# Altium PCB EEM_FMC_Carrier.PcbDoc (part 2 of 19)
Units mm, origin at the board's own origin, x right, y up, seen from the top; angles counter-clockwise.
Board outline 222.9 x 100 mm, 6 copper layers (TopLayer, MidLayer1, MidLayer2, SignalLayer1, Internal Plane 1, BottomLayer), stack 1.528 mm thick; 790 components, 743 nets, 3570 pads, 2277 vias.
Unrouted connection lines stored in the file: 3.
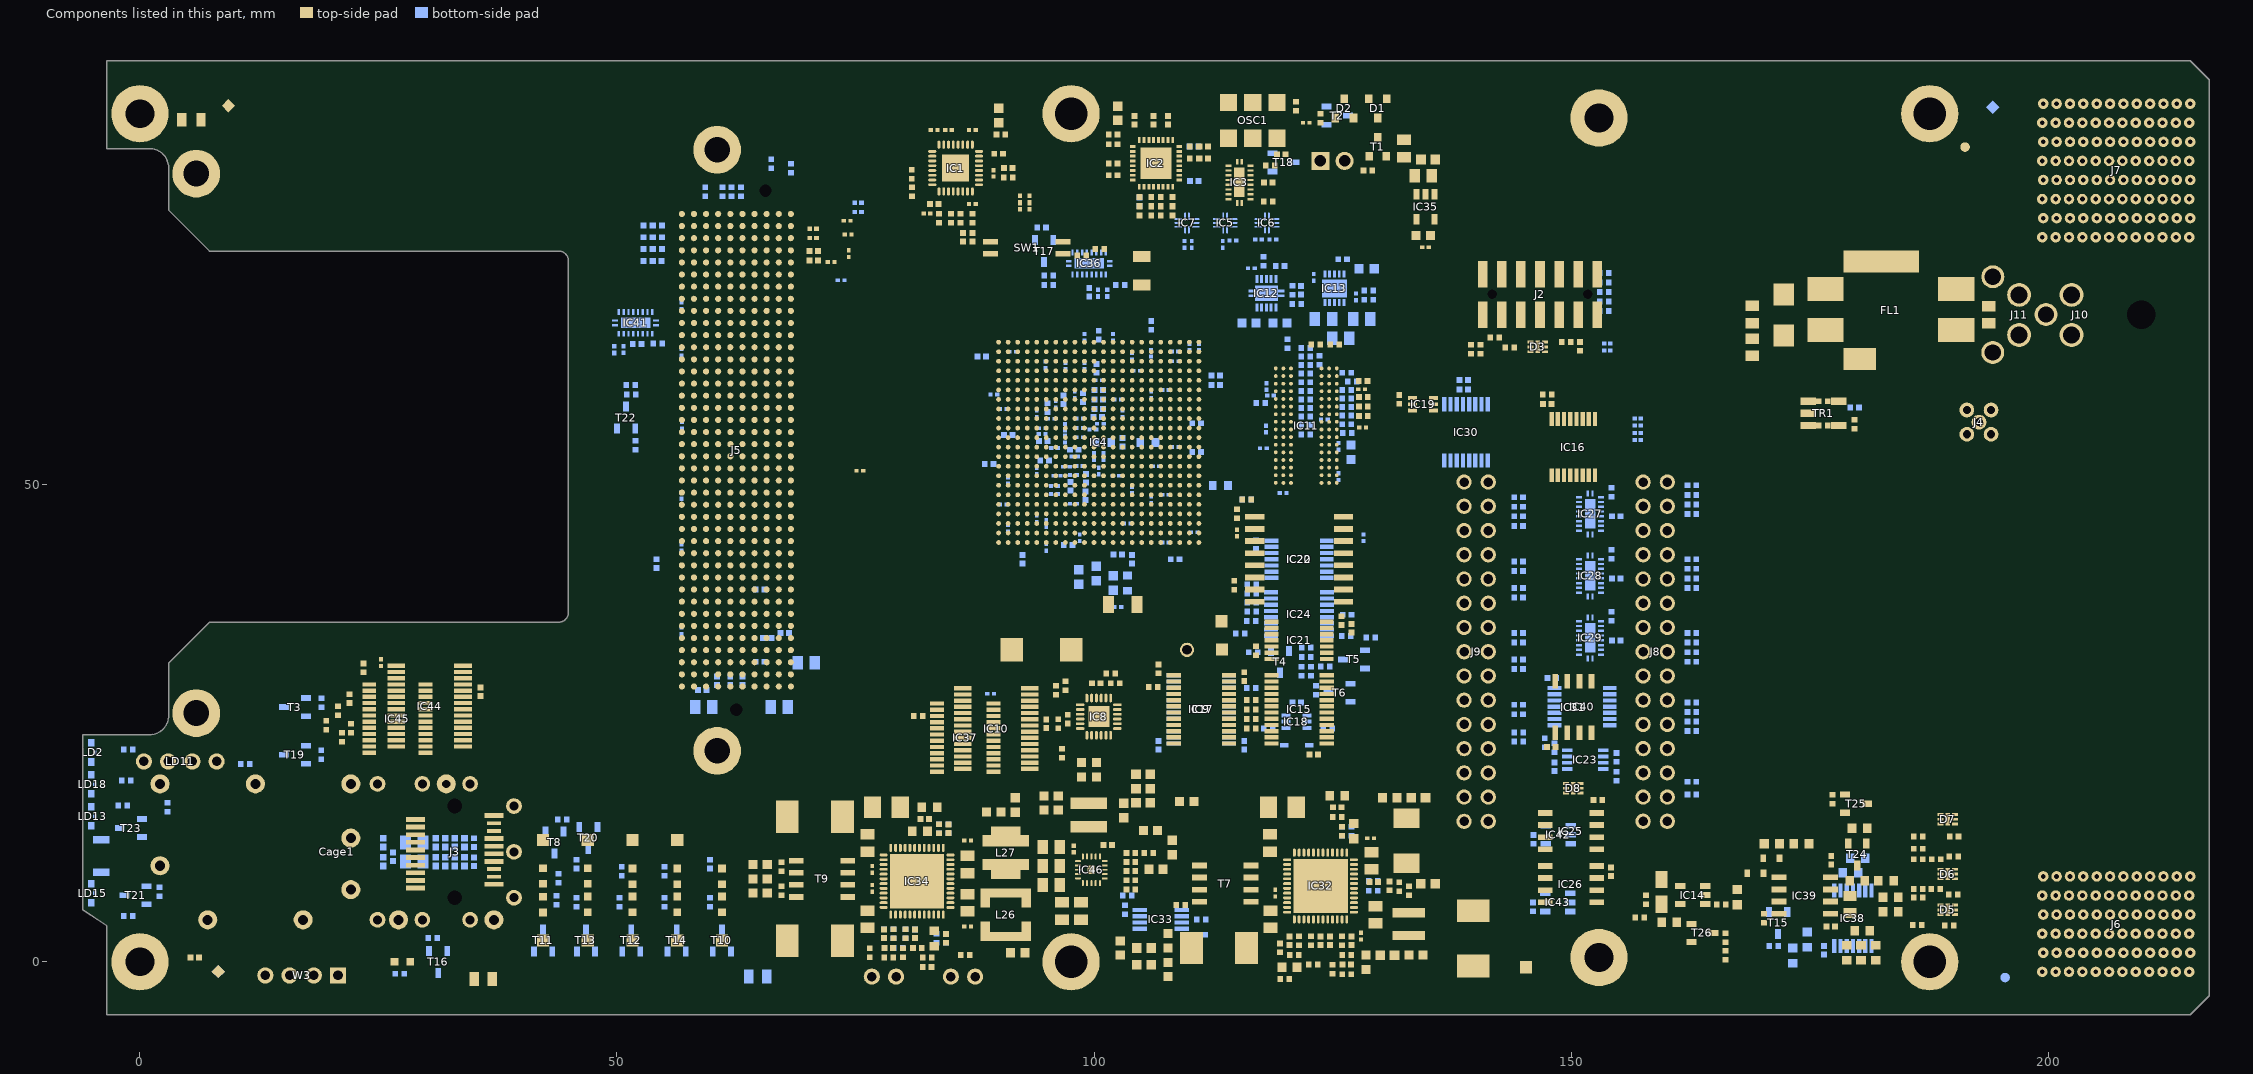
[diagram p6: the components of this part, seen from the top]

## Classes and differential pairs (continued)
differential pair FMC.LA5: +FMC.LA_P5 -FMC.LA_N5
differential pair FMC.LA4: +FMC.LA_P4 -FMC.LA_N4
differential pair FMC.LA3: +FMC.LA_P3 -FMC.LA_N3
differential pair FMC.LA2: +FMC.LA_P2 -FMC.LA_N2
differential pair FMC.LA1: +FMC.LA_P1 -FMC.LA_N1
differential pair FMC.LA0: +FMC.LA_P0 -FMC.LA_N0
differential pair FMC.HB21: +FMC.HB_P21 -FMC.HB_N21
differential pair FMC.HB20: +FMC.HB_P20 -FMC.HB_N20
differential pair FMC.HB19: +FMC.HB_P19 -FMC.HB_N19
differential pair FMC.HB18: +FMC.HB_P18 -FMC.HB_N18
differential pair FMC.HB17: +FMC.HB_P17 -FMC.HB_N17
differential pair FMC.HB16: +FMC.HB_P16 -FMC.HB_N16
differential pair FMC.HB15: +FMC.HB_P15 -FMC.HB_N15
differential pair FMC.HB14: +FMC.HB_P14 -FMC.HB_N14
differential pair FMC.HB13: +FMC.HB_P13 -FMC.HB_N13
differential pair FMC.HB12: +FMC.HB_P12 -FMC.HB_N12
differential pair FMC.HB11: +FMC.HB_P11 -FMC.HB_N11
differential pair FMC.HB10: +FMC.HB_P10 -FMC.HB_N10
differential pair FMC.HB9: +FMC.HB_P9 -FMC.HB_N9
differential pair FMC.HB8: +FMC.HB_P8 -FMC.HB_N8
differential pair FMC.HB7: +FMC.HB_P7 -FMC.HB_N7
differential pair FMC.HB6: +FMC.HB_P6 -FMC.HB_N6
differential pair FMC.HB5: +FMC.HB_P5 -FMC.HB_N5
differential pair FMC.HB4: +FMC.HB_P4 -FMC.HB_N4
differential pair FMC.HB3: +FMC.HB_P3 -FMC.HB_N3
differential pair FMC.HB2: +FMC.HB_P2 -FMC.HB_N2
differential pair FMC.HB1: +FMC.HB_P1 -FMC.HB_N1
differential pair FMC.HB0: +FMC.HB_P0 -FMC.HB_N0
differential pair FMC.HA23: +FMC.HA_P23 -FMC.HA_N23
differential pair FMC.HA22: +FMC.HA_P22 -FMC.HA_N22
differential pair FMC.HA21: +FMC.HA_P21 -FMC.HA_N21
differential pair FMC.HA20: +FMC.HA_P20 -FMC.HA_N20
differential pair FMC.HA19: +FMC.HA_P19 -FMC.HA_N19
differential pair FMC.HA18: +FMC.HA_P18 -FMC.HA_N18
differential pair FMC.HA17: +FMC.HA_P17 -FMC.HA_N17
differential pair FMC.HA16: +FMC.HA_P16 -FMC.HA_N16
differential pair FMC.HA15: +FMC.HA_P15 -FMC.HA_N15
differential pair FMC.HA14: +FMC.HA_P14 -FMC.HA_N14
differential pair FMC.HA13: +FMC.HA_P13 -FMC.HA_N13
differential pair FMC.HA12: +FMC.HA_P12 -FMC.HA_N12
differential pair FMC.HA11: +FMC.HA_P11 -FMC.HA_N11
differential pair FMC.HA10: +FMC.HA_P10 -FMC.HA_N10
differential pair FMC.HA9: +FMC.HA_P9 -FMC.HA_N9
differential pair FMC.HA8: +FMC.HA_P8 -FMC.HA_N8
differential pair FMC.HA7: +FMC.HA_P7 -FMC.HA_N7
differential pair FMC.HA6: +FMC.HA_P6 -FMC.HA_N6
differential pair FMC.HA5: +FMC.HA_P5 -FMC.HA_N5
differential pair FMC.HA4: +FMC.HA_P4 -FMC.HA_N4
differential pair FMC.HA3: +FMC.HA_P3 -FMC.HA_N3
differential pair FMC.HA2: +FMC.HA_P2 -FMC.HA_N2
differential pair FMC.HA1: +FMC.HA_P1 -FMC.HA_N1
differential pair FMC.HA0: +FMC.HA_P0 -FMC.HA_N0
differential pair EEM_IO.LVDS15: +EEM_IO.LVDS_P15 -EEM_IO.LVDS_N15
differential pair EEM_IO.LVDS14: +EEM_IO.LVDS_P14 -EEM_IO.LVDS_N14
differential pair EEM_IO.LVDS13: +EEM_IO.LVDS_P13 -EEM_IO.LVDS_N13
differential pair EEM_IO.LVDS12: +EEM_IO.LVDS_P12 -EEM_IO.LVDS_N12
differential pair EEM_IO.LVDS11: +EEM_IO.LVDS_P11 -EEM_IO.LVDS_N11
differential pair EEM_IO.LVDS10: +EEM_IO.LVDS_P10 -EEM_IO.LVDS_N10
differential pair EEM_IO.LVDS9: +EEM_IO.LVDS_P9 -EEM_IO.LVDS_N9
differential pair EEM_IO.LVDS8: +EEM_IO.LVDS_P8 -EEM_IO.LVDS_N8
differential pair EEM_IO.LVDS7: +EEM_IO.LVDS_P7 -EEM_IO.LVDS_N7
differential pair EEM_IO.LVDS6: +EEM_IO.LVDS_P6 -EEM_IO.LVDS_N6
differential pair EEM_IO.LVDS5: +EEM_IO.LVDS_P5 -EEM_IO.LVDS_N5
differential pair EEM_IO.LVDS4: +EEM_IO.LVDS_P4 -EEM_IO.LVDS_N4
differential pair EEM_IO.LVDS3: +EEM_IO.LVDS_P3 -EEM_IO.LVDS_N3
differential pair EEM_IO.LVDS2: +EEM_IO.LVDS_P2 -EEM_IO.LVDS_N2
differential pair EEM_IO.LVDS1: +EEM_IO.LVDS_P1 -EEM_IO.LVDS_N1
differential pair EEM_IO.LVDS0: +EEM_IO.LVDS_P0 -EEM_IO.LVDS_N0
differential pair BP_MGT.Tx: +BP_MGT.Tx_P -BP_MGT.Tx_N
differential pair BP_IO.LVDS15: +BP_IO.LVDS_P15 -BP_IO.LVDS_N15
differential pair BP_IO.LVDS14: +BP_IO.LVDS_P14 -BP_IO.LVDS_N14
differential pair BP_IO.LVDS13: +BP_IO.LVDS_P13 -BP_IO.LVDS_N13
differential pair BP_IO.LVDS12: +BP_IO.LVDS_P12 -BP_IO.LVDS_N12
differential pair BP_IO.LVDS11: +BP_IO.LVDS_P11 -BP_IO.LVDS_N11
differential pair BP_IO.LVDS10: +BP_IO.LVDS_P10 -BP_IO.LVDS_N10
differential pair BP_IO.LVDS9: +BP_IO.LVDS_P9 -BP_IO.LVDS_N9
differential pair BP_IO.LVDS8: +BP_IO.LVDS_P8 -BP_IO.LVDS_N8
differential pair BP_IO.LVDS7: +BP_IO.LVDS_P7 -BP_IO.LVDS_N7
differential pair BP_IO.LVDS6: +BP_IO.LVDS_P6 -BP_IO.LVDS_N6
differential pair BP_IO.LVDS5: +BP_IO.LVDS_P5 -BP_IO.LVDS_N5
differential pair BP_IO.LVDS4: +BP_IO.LVDS_P4 -BP_IO.LVDS_N4
differential pair BP_IO.LVDS3: +BP_IO.LVDS_P3 -BP_IO.LVDS_N3
differential pair BP_IO.LVDS2: +BP_IO.LVDS_P2 -BP_IO.LVDS_N2
differential pair BP_IO.LVDS1: +BP_IO.LVDS_P1 -BP_IO.LVDS_N1
differential pair BP_IO.LVDS0: +BP_IO.LVDS_P0 -BP_IO.LVDS_N0
differential pair CK_MMCX_IN: +CK_MMCX_IN_P -CK_MMCX_IN_N
differential pair CK_MMCX: +CK_MMCX_P -CK_MMCX_N
differential pair DDR3_CK: +DDR3_CK_P -DDR3_CK_N
differential pair DDR3_LDQS: +DDR3_LDQS_P -DDR3_LDQS_N
differential pair DDR3_UDQS: +DDR3_UDQS_P -DDR3_UDQS_N
differential pair MGT_RX3: +MGT_RX3_P -MGT_RX3_N
differential pair MGT_TX3: +MGT_TX3_P -MGT_TX3_N
differential pair GBTCLK0_M2C: +GBTCLK0_M2C_P -GBTCLK0_M2C_N

## Components (designator, comment, footprint, x,y, rotation, side; value= is the part's Value field where it differs from the comment)
B1 "Plated Hole" c150h100 109.748,32.7 r0 top
B2 "Test Point" TPS127#1 113.375,35.7 r90 top
B3 "Test Point" TPS127#1 113.4,32.725 r90 top
B6 "Plated Hole" MTG270_500 5.9,26.069 r0 top
B7 "Plated Hole" MTG270_500 5.9,82.619 r0 top
B8 "Plated Hole" MTG270_500 60.5,85.119 r0 top
B9 "Plated Hole" MTG270_500 60.5,22.119 r0 top locked
C1 "100nF" CAPC1005X55N 104.748,78.7 r270 top
C2 "100nF" CAPC1005X55N 105.998,78.7 r270 top
C3 "100nF" CAPC1005X55N 179.724,58.117 r180 bottom
C4 "100nF" CAPC1005X55N 87.248,75.95 r270 top
C5 "100nF" CAPC1005X55N 104.748,79.7 r90 top
C6 "100nF" CAPC1005X55N 86.248,75.95 r270 top
C7 "100nF" CAPC1005X55N 105.998,79.7 r90 top
C8 "10nF" CAPC1005X55N 90.998,83.2 r180 top
C9 "100nF" CAPC1005X55N 106.998,78.7 r270 top
C10 "100nF" CAPC1005X55N 110.523,81.825 r180 bottom
C11 "100nF" CAPC1005X55N 108.248,78.7 r270 top
C12 "100nF" CAPC1005X55N 106.998,79.7 r90 top
C13 "100nF" CAPC1005X55N 108.248,79.7 r90 top
C14 "10uF" CAPC1005X70N 33,10.5 r90 bottom
C15 "10nF" CAPC1005X55N 89.998,84.7 r180 top
C16 "100nF" CAPC1005X55N 110.473,85.475 r180 bottom
C17 "10uF" CAPC1005X70N 32,10.5 r90 bottom
C18 "10uF" CAPC1005X70N 34,10.5 r90 bottom
C19 "10uF" CAPC1005X70N 31,10.5 r90 bottom
C20 "100nF" CAPC1005X55N 35,10.5 r270 bottom
C21 "100nF" CAPC1005X55N 104.748,79.675 r90 bottom
C22 "10nF" CAPC1005X55N 107.748,88.2 r270 top
C23 "10nF" CAPC1005X55N 101.998,85.7 r0 top
C24 "10nF" CAPC1005X55N 101.998,82.45 r0 top
C25 "100nF" CAPC1005X55N 101.998,86.7 r0 top
C26 "10nF" CAPC1005X55N 104.248,88.2 r270 top
C27 "10nF" CAPC1005X55N 106.248,88.2 r270 top
C28 "10nF" CAPC1005X55N 101.998,83.7 r0 top
C29 "100nF" CAPC1005X55N 111.498,84.2 r0 top
C30 "100nF" CAPC1005X55N 111.498,85.45 r0 top
C31 "10nF" CAPC1005X55N 119.623,84.65 r180 top
C32 "1uF" CAPC1005X55N 90.248,86.7 r180 top
C33 "100nF" CAPC0603X33N#1 83.248,87.2 r0 top
C34 "100nF" CAPC0603X33N#1 87.248,79.45 r180 top
C35 "100nF" CAPC0603X33N#1 82.498,78.45 r0 top
C36 "100nF" CAPC0603X33N#1 84.748,87.2 r180 top
C37 "470nF" CAPC0603X33N#1 87.248,87.2 r180 top
C38 "22pF" CAPC1005X55N 83.248,79.45 r0 top
C39 "100nF" CAPC1005X55N 118.248,81.7 r180 top
C40 "1uF" CAPC1608X87N 167.431,6.782 r270 top
C41 "100nF" CAPC0603X33N#1 109.998,64.45 r270 bottom
C42 "10uF" CAPC1005X70N 25.5,12.5 r270 bottom
C43 "2.2uF" CAPMP3216X180N 159.502,7.33 r90 top
C44 "10uF" CAPC2012X95N 128.075,67.394 r180 bottom
C45 "100nF" CAPC0603X33N#1 103.974,63.461 r270 bottom
C46 "100nF" CAPC0603X33N#1 114.548,75.6 r180 bottom
C47 "100nF" CAPC0603X33N#1 118.748,75.7 r180 bottom
C48 "100nF" CAPC0603X33N#1 110.248,75.2 r90 bottom
C49 "100nF" CAPC0603X33N#1 113.498,75.2 r90 bottom
C50 "100nF" CAPC0603X33N#1 117.248,75.7 r0 bottom
C51 "100nF" CAPC0603X33N#1 109.498,75.2 r90 bottom
C52 "100nF" CAPC0603X33N#2 75.275,78.6 r0 bottom
C53 "100nF" CAPC0603X33N#2 75.275,79.575 r0 bottom
C54 "100nF" CAPC0603X33N#2 70.55,76.825 r0 top
C55 "100nF" CAPC0603X33N#2 70.55,75.875 r0 top
C56 "100nF" CAPC0603X33N#2 50.675,64.182 r270 bottom
C57 "100nF" CAPC0603X33N#2 49.725,64.175 r270 bottom
C58 "100nF" CAPC0603X33N#2 101.375,70.1 r270 bottom
C59 "100nF" CAPC0603X33N#2 100.425,70.1 r270 bottom
C60 "100nF" CAPC0603X33N#2 97.875,11.825 r270 top
C61 "10uF" CAPC2012X95N 95.525,12.05 r0 top
C62 "10uF" CAPC2012X95N 98.65,5.325 r90 top
C63 "10uF" CAPC2012X95N 96.65,5.325 r90 top
C64 "100nF" CAPC0603X33N#1 90.498,47.95 r0 bottom
C65 "100nF" CAPC0603X33N#1 94.998,45.95 r90 bottom
C66 "100nF" CAPC1005X55N 115.748,22.7 r90 bottom
C67 "100nF" CAPC1005X55N 106.748,22.7 r90 bottom
C68 "10uF" CAPC2012X95N 95.525,10.05 r0 top
C69 "10uF" CAPC2012X95N 95.525,8.05 r0 top
C70 "22uF" CAPC1608X90N 95.5,15.9 r0 top
C71 "22uF" CAPC1608X90N 95.5,17.4 r0 top
C72 "10uF" CAPC2012X95N 132.5,85.25 r270 top
C73 "100nF" CAPC0603X33N#1 122.248,87.95 r180 top
C74 "100nF" CAPC1005X55N 100.248,29.2 r0 top
C75 "100nF" CAPC1005X55N 115.75,29.9 r270 top
C76 "100nF" CAPC1005X55N 106.748,30.7 r270 top
C77 "100nF" CAPC1005X55N 94.998,24.95 r90 top
C78 "100nF" CAPC0603X33N#3 118.498,59.375 r0 bottom
C79 "100nF" CAPC0603X33N#1 128.15,55.994 r180 top
C80 "100nF" CAPC0603X33N#1 118.073,60.3 r270 bottom
C81 "100nF" CAPC0603X33N#1 118.023,55.85 r90 bottom
C82 "100nF" CAPC0603X33N#1 119.823,49.125 r0 bottom
C83 "100nF" CAPC0603X33N#1 125.623,50.85 r270 bottom
C84 "100nF" CAPC0603X33N#1 128.048,60.025 r180 top
C85 "100nF" CAPC0603X33N#1 125.623,54.025 r90 bottom
C86 "100nF" CAPC0603X33N#1 117.748,53.825 r0 bottom
C87 "100nF" CAPC0603X33N#1 124.148,56.85 r180 bottom
C88 "1uF" CAPC1005X55N 119.498,72.95 r180 bottom
C89 "22uF" CAPC1608X90N 126.923,53.425 r90 bottom
C90 "22uF" CAPC1608X90N 116.248,66.95 r0 bottom
C91 "22uF" CAPC1608X90N 119.498,66.95 r180 bottom
C92 "10nF" CAPC1005X55N 121.695,70.398 r270 bottom
C93 "100nF" CAPC0603X33N#1 116.498,72.7 r0 bottom
C94 "1uF" CAPC1608X87N 128.575,72.644 r180 bottom
C95 "100nF" CAPC0603X33N#1 127.45,69.694 r270 bottom
C96 "10uF" CAPC2012X95N 125.875,65.369 r180 bottom
C97 "470nF" CAPC0603X33N#1 98.501,54.991 r0 bottom
C98 "100nF" CAPC0603X33N#1 98.498,55.95 r0 bottom
C99 "4.7uF" CAPC1005X55N 100.248,62.2 r270 bottom
C100 "100uF" CAPC3216X180N 104.998,72.45 r270 top
C101 "47uF" CAPC1608X100N 105.648,54.45 r0 bottom
C102 "470nF" CAPC0603X33N#1 100.498,60.95 r0 bottom
C103 "680uF" CAPMP7343X430N 94.498,32.725 r180 top
C104 "4.7uF" CAPC1005X55N 100.498,58.95 r180 bottom
C105 "4.7uF" CAPC1005X55N 99.125,48.85 r90 bottom
C106 "4.7uF" CAPC1005X55N 100.498,57.95 r180 bottom
C107 "4.7uF" CAPC1005X55N 97.942,53.67 r180 bottom
C108 "4.7uF" CAPC1005X55N 94.666,54.585 r0 bottom
C109 "4.7uF" CAPC1005X55N 99.15,50.7 r90 bottom
C110 "100uF" CAPC3216X180N 102.998,37.45 r180 top
C111 "100nF" CAPC0603X33N#1 89.175,28.1 r180 bottom
C112 "470nF" CAPC0603X33N#1 98.498,56.95 r0 bottom
C113 "470nF" CAPC0603X33N#1 99.998,52.95 r270 bottom
C114 "100nF" CAPC0603X33N#1 25.275,31.35 r270 top
C115 "4.7uF" CAPC1005X55N 112.748,61.45 r180 bottom
C116 "4.7uF" CAPC1005X55N 92.498,42.2 r90 bottom
C117 "470nF" CAPC0603X33N#1 107.498,43.95 r180 bottom
C118 "470nF" CAPC0603X33N#1 98.498,44.45 r90 bottom
C119 "470nF" CAPC0603X33N#1 105.998,48.45 r270 bottom
C120 "4.7uF" CAPC1005X55N 103.998,42.2 r90 bottom
C121 "4.7uF" CAPC1005X55N 90.998,55.2 r0 bottom
C122 "470nF" CAPC0603X33N#1 90.498,57.95 r0 bottom
C123 "470nF" CAPC0603X33N#1 94.998,43.45 r90 bottom
C124 "470nF" CAPC0603X33N#1 110.998,64.45 r270 bottom
C125 "4.7uF" CAPC1005X55N 105.998,66.7 r270 bottom
C126 "4.7uF" CAPC1005X55N 112.748,60.45 r180 bottom
C127 "470nF" CAPC0603X33N#1 89.498,59.45 r0 bottom
C128 "470nF" CAPC0603X33N#1 104.498,61.95 r180 bottom
C129 "470nF" CAPC0603X33N#1 101.998,65.45 r270 bottom
C130 "4.7uF" CAPC1005X55N 88.248,63.45 r0 bottom
C131 "4.7uF" CAPC1005X55N 88.998,52.2 r0 bottom
C132 "470nF" CAPC0603X33N#1 93.998,51.45 r270 bottom
C133 "470nF" CAPC0603X33N#1 90.998,50.45 r270 bottom
C134 "470nF" CAPC0603X33N#1 103.498,45.95 r180 bottom
C135 "4.7uF" CAPC1005X55N 110.748,56.45 r180 bottom
C136 "4.7uF" CAPC1005X55N 110.748,53.45 r180 bottom
C137 "470nF" CAPC0603X33N#1 107.498,59.95 r0 bottom
C138 "470nF" CAPC0603X33N#1 102.998,57.45 r270 bottom
C139 "470nF" CAPC0603X33N#1 105.998,59.45 r270 bottom
C140 "470nF" CAPC0603X33N#1 108.498,53.95 r0 bottom
C141 "470nF" CAPC0603X33N#1 90.998,45.45 r90 bottom
C142 "470nF" CAPC0603X33N#1 108.498,62.95 r180 bottom
C143 "470nF" CAPC0603X33N#1 93.998,57.45 r90 bottom
C144 "470nF" CAPC0603X33N#1 93.998,46.45 r90 bottom
C145 "470nF" CAPC0603X33N#1 94.564,55.321 r0 bottom
C146 "470nF" CAPC0603X33N#1 97.975,59.425 r270 bottom
C147 "470nF" CAPC0603X33N#1 97.841,48.006 r0 bottom
C148 "470nF" CAPC0603X33N#1 97.841,51.029 r0 bottom
C149 "470nF" CAPC0603X33N#1 96.952,56.032 r90 bottom
C150 "470nF" CAPC0603X33N#1 95.86,53.873 r0 bottom
C151 "470nF" CAPC0603X33N#1 96.139,50.952 r180 bottom
C152 "470nF" CAPC0603X33N#1 95.998,58.45 r270 bottom
C153 "47uF" CAPC1608X100N 100.998,54.45 r0 bottom
C154 "22uF" CAPC2012X135N 179.241,5.998 r90 top
C155 "100nF" CAPC1005X55N 177.281,10.636 r270 top
C156 "4.7uF" CAPC1005X55N 100.498,65.7 r270 bottom
C157 "470nF" CAPC0603X33N#1 100.498,51.448 r270 bottom
C158 "470nF" CAPC0603X33N#1 100.998,52.95 r90 bottom
C159 "470nF" CAPC0603X33N#1 102.498,58.95 r180 bottom
C160 "470nF" CAPC0603X33N#1 102.298,50.95 r180 bottom
C161 "470nF" CAPC0603X33N#1 100.674,56.406 r0 bottom
C162 "4.7uF" CAPC1005X55N 102.498,42.7 r180 bottom
C163 "4.7uF" CAPC1005X55N 100.498,59.95 r0 bottom
C164 "47uF" CAPC1608X100N 103.498,39.7 r90 bottom
C165 "100nF" CAPC1005X55N 177.233,3.713 r0 top
C166 "1uF" CAPC1608X87N 171.057,12.361 r0 top
C167 "100nF" CAPC1005X55N 176.5,1.225 r90 bottom
C168 "100nF" CAPC0603X33N#1 91.498,63.95 r0 bottom
C169 "100nF" CAPC0603X33N#1 98.998,65.45 r270 bottom
C170 "100nF" CAPC0603X33N#1 98.998,62.45 r270 bottom
C171 "100nF" CAPC0603X33N#1 74.298,74.225 r90 top
C172 "100nF" CAPC0603X33N#1 94.925,62.575 r270 bottom
C173 "100nF" CAPC0603X33N#1 102.498,37.2 r180 bottom
C174 "4.7uF" CAPC1005X55N 100.4,57.125 r0 bottom
C175 "47uF" CAPC1608X100N 113.248,49.95 r180 bottom
C176 "100nF" CAPC0603X33N#1 74.223,76.25 r180 top
C177 "4.7uF" CAPC1005X55N 108.498,42.2 r0 bottom
C178 "4.7uF" CAPC1005X55N 102.998,54.45 r270 bottom
C179 "100nF" CAPC1005X55N 123.048,21.725 r180 top
C180 "100nF" CAPC1005X55N 147.498,58.45 r0 top
C181 "100nF" CAPC1005X55N 121.248,27.2 r180 bottom
C182 "470nF" CAPC0603X33N#1 110.498,45.025 r180 bottom
C183 "470nF" CAPC0603X33N#1 106.498,51.95 r0 bottom
C184 "100nF" CAPC1005X55N 131.998,58.95 r270 top
C185 "100nF" CAPC1005X55N 126.998,34.95 r90 top
C186 "100nF" CAPC1005X55N 154.773,21.425 r270 bottom
C187 "100nF" CAPC1005X55N 148.248,20.45 r90 bottom
C188 "100nF" CAPC0603X33N#1 114.998,44.95 r90 top
C189 "100nF" CAPC0603X33N#1 128.248,44.45 r270 bottom
C190 "100nF" CAPC1005X55N 126.525,36.375 r180 bottom
C191 "100nF" CAPC1005X55N 116.998,43.7 r90 bottom
C192 "10uF" CAPC1005X70N 25.5,10.5 r90 bottom
C193 "100nF" CAPC0603X33N#1 75.448,51.475 r180 top
C194 "100nF" CAPC0603X33N#1 73.498,71.45 r180 bottom
C195 "100nF" CAPC1005X55N 61.873,29.45 r270 bottom
C196 "100nF" CAPC1005X55N 63.173,29.45 r90 bottom
C197 "10uF" CAPC2012X95N 59.098,26.725 r180 bottom
C198 "1uF" CAPC1005X55N 58.923,28.5 r180 bottom
C199 "10nF" CAPC1005X55N 70.623,74.5 r0 top
C200 "10nF" CAPC1005X55N 70.623,73.5 r0 top
C201 "10uF" CAPC2012X95N 134.5,82.402 r0 top
C202 "100nF" CAPC0603X33N#1 134.75,74.902 r0 top
C203 "100nF" CAPC1005X55N 64.998,39.025 r180 bottom
C204 "10uF" CAPC2012X95N 69.823,31.35 r0 bottom
C205 "1uF" CAPC1005X55N 67.598,34.475 r0 bottom
C206 "100nF" CAPC1005X55N 60.498,29.45 r90 bottom
C207 "100nF" CAPC1005X55N 64.998,31.45 r180 bottom
C208 "10uF" CAPC2012X95N 66.998,26.7 r0 bottom
C209 "1uF" CAPC1005X55N 65.748,33.95 r0 bottom
C210 "10nF" CAPC1005X55N 54.248,74.7 r0 bottom
C211 "10nF" CAPC1005X55N 54.223,73.45 r0 bottom
C212 "22pF" CAPC1005X55N 5.748,0.45 r0 top
C213 "10nF" CAPC1005X55N 53.248,74.7 r180 bottom
C214 "10nF" CAPC1005X55N 53.248,73.45 r180 bottom
C215 "10nF" CAPC1005X55N 53.248,77.2 r180 bottom
C216 "10nF" CAPC1005X55N 53.248,75.95 r180 bottom
C217 "10nF" CAPC1005X55N 54.248,77.2 r0 bottom
C218 "10nF" CAPC1005X55N 54.248,75.95 r0 bottom
C219 "100nF" CAPC1005X55N 152.825,16.944 r0 top
C220 "100nF" CAPC1005X55N 154.2,9.45 r90 top
C221 "1nF" CAPC1005X55N 138.748,60 r0 bottom
C222 "100nF" CAPC1005X55N 138.748,61 r0 bottom
C223 "100nF" CAPC1005X55N 154.748,40.2 r180 bottom
C224 "100nF" CAPC1005X55N 154.748,46.7 r180 bottom
C225 "100nF" CAPC1005X55N 154.748,33.7 r180 bottom
C226 "100nF" CAPC1005X55N 147.925,22.5 r0 top
C227 "56pF" CAPC1608X87N 120.498,-0.55 r180 top
C228 "22uF" CAPC1608X90N 107.748,-0.8 r90 top
C229 "22uF" CAPC1608X90N 107.748,2.2 r270 top
C230 "22uF" CAPC1608X90N 102.748,1.45 r270 top
C231 "33uF" CAPMP3528X210N 119.748,16.2 r0 top
C232 "10uF" CAPC2012X95N 118.498,4.45 r90 top
C233 "10uF" CAPC2012X95N 118.439,12.446 r270 top
C234 "10uF" CAPC2012X95N 129.073,10.6 r270 top
C235 "10uF" CAPC2012X95N 129.498,4.95 r90 top
C236 "22uF" CAPC1608X90N 109.725,16.8 r180 top
C237 "100nF" CAPC0603X33N#1 118.998,7.2 r90 top
C238 "1nF" CAPC1005X55N 120.498,2.2 r270 top
C239 "22uF" CAPC1608X90N 100.25,20.125 r270 top
C240 "22uF" CAPC1608X90N 98.7,20.125 r270 top
C241 "1uF" CAPC1005X55N 101.45,12.225 r180 top
C242 "22uF" CAPC1608X90N 105.925,13.75 r180 top
C243 "22uF" CAPC1608X90N 106.498,9.7 r0 top
C245 "100nF" CAPC1005X55N 111.183,2.835 r180 bottom
C248 "100nF" CAPC0603X33N#1 127.998,2.7 r90 top
C249 "1nF" CAPC1005X55N 126.998,2.2 r270 top
C250 "22uF" CAPC1608X90N 133.748,0.7 r180 top
C251 "22uF" CAPC1608X90N 128.498,-0.05 r90 top
C252 "68pF" CAPC1005X55N 126.498,-0.3 r0 top
C253 "100nF" CAPC0603X33N#1 128.998,12.95 r180 top
C254 "1.2nF" CAPC1608X87N 127.248,13.7 r90 top
C255 "22uF" CAPC1608X90N 130.998,17.2 r0 top
C256 "68pF" CAPC1005X55N 125.498,16.2 r0 top
C257 "1uF" CAPC1005X55N 129.323,8.35 r180 top
C258 "1uF" CAPC1005X55N 124.748,2.2 r90 top
C259 "1uF" CAPC1005X55N 123.748,2.2 r90 top
C260 "1uF" CAPC1005X55N 130.973,7.95 r270 top
C261 "82pF" CAPC1005X55N 78.498,1.45 r180 top
C262 "10uF" CAPC2012X95N 169,67.85 r270 top
C263 "10uF" CAPC2012X95N 169,64.425 r90 top
C264 "10uF" CAPC2012X95N 193.783,67.809 r270 top
C265 "33uF" CAPMP3528X210N 78.248,16.2 r0 top
C266 "10uF" CAPC2012X95N 76.248,12.45 r270 top
C267 "10uF" CAPC2012X95N 76.248,4.45 r90 top
C268 "10uF" CAPC2012X95N 86.748,10.2 r270 top
C269 "10uF" CAPC2012X95N 86.748,6.2 r90 top
C270 "100nF" CAPC0603X33N#1 76.748,7.7 r90 top
C271 "2.2nF" CAPC1005X55N 77.998,2.95 r270 top
C272 "22uF" CAPC1608X90N 64.998,10.2 r180 top
C273 "22uF" CAPC1608X90N 64.998,7.2 r180 top
C274 "22uF" CAPC1608X90N 64.998,8.7 r180 top
C275 "100nF" CAPC0603X33N#1 76.748,9.7 r270 top
C276 "100nF" CAPC0603X33N#1 86.748,3.7 r180 top
C277 "3.9nF" CAPC1005X55N 84.498,2.45 r270 top
C278 "22uF" CAPC1608X90N 91.998,0.95 r180 top
C279 "82pF" CAPC1005X55N 82.498,-0.55 r0 top
C280 "100nF" CAPC0603X33N#1 86.748,12.7 r180 top
C281 "2.2nF" CAPC1005X55N 84.748,13.95 r90 top
C282 "22uF" CAPC1608X90N 89.498,15.7 r0 top
C283 "100pF" CAPC1005X55N 82.248,14.95 r0 top
C284 "1uF" CAPC1005X55N 81.248,2.95 r90 bottom
C285 "1uF" CAPC1005X55N 81.248,2.95 r90 top
C286 "22uF" CAPC1608X90N 134.5,76.152 r0 top
C287 "100nF" CAPC1005X55N 99.498,70.2 r90 bottom
C288 "470nF" CAPC0603X33N#1 103.998,49.45 r90 bottom
C289 "470nF" CAPC0603X33N#1 107.498,48.95 r0 bottom
C290 "100nF" CAPC0603X33N#1 74.123,77.675 r180 top
C291 "100nF" CAPC0603X33N#1 56.773,48.875 r270 bottom
C292 "100nF" CAPC0603X33N#1 56.773,63.875 r270 bottom
C293 "100nF" CAPC0603X33N#1 72.448,73.35 r180 top
C294 "100nF" CAPC0603X33N#1 56.773,68.75 r90 bottom
C295 "100nF" CAPC0603X33N#1 56.798,56.225 r270 bottom
C296 "100nF" CAPC0603X33N#1 56.773,43.425 r90 bottom
C297 "100nF" CAPC0603X33N#1 56.773,34.7 r90 bottom
C298 "100nF" CAPC1005X55N 148,29.75 r0 bottom
C299 "100nF" CAPC1005X55N 26.5,11 r270 bottom
C300 "100nF" CAPC1005X55N 52.1,64.775 r180 bottom
C301 "10uF" CAPC1005X70N 31,12.5 r270 bottom
C302 "10uF" CAPC1005X70N 32,12.5 r270 bottom
C303 "10uF" CAPC1005X70N 33,12.5 r270 bottom
C304 "10uF" CAPC2012X95N 124.05,67.394 r0 bottom
C305 "100nF" CAPC0603X33N#1 123.025,71.744 r90 bottom
C306 "100nF" CAPC1005X55N 146.05,12.825 r270 bottom
C307 "100nF" CAPC1005X55N 146.025,5.75 r270 bottom
C308 "4.7uF" CAPC1005X55N 96.801,58.927 r270 bottom
C309 "4.7uF" CAPC1005X55N 97.275,43.7 r180 bottom
C310 "4.7uF" CAPC1005X55N 97.536,49.86 r90 bottom
C311 "4.7uF" CAPC1005X55N 94.818,52.553 r0 bottom
C312 "4.7uF" CAPC1005X55N 95.125,58.1 r270 bottom
C313 "4.7uF" CAPC1005X55N 98.85,59.15 r270 bottom
C314 "470nF" CAPC0603X33N#1 94.564,55.931 r0 bottom
C315 "470nF" CAPC0603X33N#1 95.5,56.925 r0 bottom
C316 "470nF" CAPC0603X33N#1 95.849,49.875 r0 bottom
C317 "470nF" CAPC0603X33N#1 96.952,54.788 r270 bottom
C318 "470nF" CAPC0603X33N#1 97.1,51.9 r180 bottom
C319 "470nF" CAPC0603X33N#1 95.849,49.025 r0 bottom
C320 "470nF" CAPC0603X33N#1 99.875,55.8 r180 bottom
C321 "10uF" CAPC1005X70N 34,12.5 r270 bottom
C322 "100nF" CAPC1005X55N 35,12.5 r90 bottom
C323 "100nF" CAPC1005X55N 35.7,28.3 r270 top
Cage1 "SFP+" TYCO_2007198-1 33,11.525 r0 top locked
D1 "BAV199LT1G" ONSC-SOT-23-3-318-08_V 129.748,89.45 r270 top
D2 "BAV199LT1G" ONSC-SOT-23-3-318-08_V 126.248,89.45 r90 top
D3 "UCLAMP3305P.TCT" SON50P160X65_HS-7N 146.498,64.45 r180 top
D4 "BAT165" SOD2512X110N 121.248,22.7 r180 bottom
D5 "UCLAMP3305P.TCT" SON50P160X65_HS-7N 189.498,5.45 r0 top
D6 "UCLAMP3305P.TCT" SON50P160X65_HS-7N 189.498,9.2 r0 top
D7 "UCLAMP3305P.TCT" SON50P160X65_HS-7N 189.498,14.95 r0 top
D8 "UCLAMP3305P.TCT" SON50P160X65_HS-7N 150.248,18.2 r180 top
D10 "SMBJ12A" DIOM5336X265N 172.283,67.809 r90 top
D12 "CDBU0520-HF" SOD-523F 169.327,9.302 r0 top
D13 "CDBU0520-HF" SOD-523F 171.01,10.85 r180 top
FL1 "10A/50VDC" FIL_MURATA_BNX02 183.533,68.309 r180 top
FTG1 "Use only in PCB" FIDUCIAL_TOP_C100-200#1 191.3,85.4 r90 top
FTG2 "Use only in PCB" FIDUCIAL_TOP_S100-200 8.204,-1.016 r90 top
FTG3 "Use only in PCB" FIDUCIAL_TOP_S100-200 194.2,89.575 r90 bottom
FTG4 "Use only in PCB" FIDUCIAL_TOP_S100-200 8.204,-1.016 r90 bottom
FTG5 "Use only in PCB" FIDUCIAL_TOP_S100-200 9.275,89.725 r90 top
FTG6 "Use only in PCB" FIDUCIAL_TOP_C100-200#2 195.5,-1.65 r90 bottom
HS1 "RADIAN_FI23" RADIAN_FI23 101.248,54.6 r270 top
IC1 "ADCLK948BCPZ" QFN50P500X500X80-33N-S285 85.498,83.2 r180 top
IC2 "SY58029U" MLF-32 108.948,81.95 r180 top
IC3 "HD3SS3212RKS" TEXAS_RKS0020A 115.248,81.7 r180 top
IC4 "XC7A200T-3FBG484E" BGA484C100P22X22_2300X2300X254 100.498,54.45 r0 top locked
IC5 "SN74AVC2T245RSWR" QFN40P140X180X55-10N 113.748,77.45 r270 bottom
IC6 "SN74AVC2T245RSWR" QFN40P140X180X55-10N 118.123,77.45 r270 bottom
IC7 "SN74AVC2T245RSWR" QFN40P140X180X55-10N 109.748,77.45 r270 bottom
IC8 "TCA9548ARGER" QFN50P400X400X100-25N-S220 100.498,25.7 r0 top
IC9 "SN74LVC8T245PW" SOP65P640X120-24N 111.248,26.45 r0 top
IC10 "MCP23017-E/SS" SOP65P780X200-28N 89.748,24.45 r180 top
IC11 "MT41K256M16TW-107:P" BGA96C80P9X16_800X1400X120 122.248,56.2 r180 top locked
IC12 "TPS51200DRCT" "TEXAS_DRC (S-PVSON-N10)" 118.07,70.073 r90 bottom
IC13 "NCP51200MNTXG" SON50P300X300X100-11N 125.2,70.594 r90 bottom
IC14 "MIC5219-3.3YM5" SOT95P280X145-5N 162.75,7 r180 top
IC15 "SN74LVC8T245PW" SOP65P640X120-24N 121.498,26.45 r180 top
IC16 "SN74CB3T3257PW" SOP65P640X120-16N 150.248,53.95 r90 top
IC17 "SN74LVC8T245PW" SOP65P640X120-24N 111.248,26.45 r0 bottom
IC18 "NC7SZ157P6X" SOT65P210X110-6N 121.223,25.175 r0 bottom
IC19 "NC7SZ157P6X" SOT65P210X110-6N 134.498,58.45 r180 top
IC20 "CD74HC4066PWR" CD74HC4066PWR 121.498,42.2 r180 bottom
IC21 "CD74HC4066PWR" CD74HC4066PWR 121.498,33.7 r0 top
IC22 "S25FL128SAGMFIR01" SOIC127P1030X265-16N 121.498,42.2 r0 top
IC23 "PCA9306DCTR" SOP65P400X130-8N 151.498,21.2 r0 bottom
IC24 "SC18IS606PWJ" SOP65P640X110-16N#1 121.498,36.45 r0 bottom
IC25 "24AA025E48-I/SN" SOIC127P600X175-8N 149.998,13.7 r0 top
IC26 "24AA025E48-I/SN" SOIC127P600X175-8N 149.998,8.15 r0 top
IC27 "HD3SS3212RKS" TEXAS_RKS0020A 151.998,46.95 r180 bottom
IC28 "HD3SS3212RKS" TEXAS_RKS0020A 151.998,40.45 r180 bottom
IC29 "HD3SS3212RKS" TEXAS_RKS0020A 151.998,33.95 r180 bottom
IC30 "MAX9122EUE+" SOP65P640X110-16N#2 138.998,55.5 r90 bottom
IC31 "ADN4661BRZ" SOIC127P600X175-8N 150.248,26.7 r90 top
IC32 "ADP5052ACPZ" QFN50P700X700X80-49N-S570 123.748,7.95 r180 top
IC33 "LM75AIMM/NOPB" SOP65P490X109-8N 106.998,4.45 r0 bottom
IC34 "ADP5052ACPZ" QFN50P700X700X80-49N-S570 81.45,8.449 r180 top
IC35 "MIC5219-5.0YM5" SOT95P280X145-5N 134.75,79.152 r270 top
IC36 "HD3SS3212RKS" TEXAS_RKS0020A 99.498,73.2 r90 bottom
IC37 "PCA9539APW" SOP65P640X110-24N 86.5,23.5 r0 top
IC38 "CD74HC4066PWR" CD74HC4066PWR 179.548,4.575 r270 bottom
IC39 "TLC555ID" SOIC127P600X175-8N 174.498,6.95 r0 top
IC40 "CD74HC4066PWR" CD74HC4066PWR 151.154,26.746 r180 bottom
IC41 "HD3SS3212RKS" TEXAS_RKS0020A 51.95,66.975 r90 bottom
IC42 "24AA02E48T-I/OT" SOT95P280X145-5N 148.65,13.325 r180 bottom
IC43 "24AA02E48T-I/OT" SOT95P280X145-5N 148.625,6.225 r180 bottom
IC44 "MCP23017-E/SS" SOP65P780X200-28N 30.353,26.8 r180 top
IC45 "PCA9539APW" SOP65P640X110-24N 26.975,25.5 r0 top
IC46 "TPS51396ARJET" QFN45P300X300X100-21N-D 99.725,9.65 r0 top
J1 "KK®" MOLEX_22-27-2021 124.998,83.95 r0 top
J2 "Milli-Grid™" MOLEX_87832-1420 146.748,69.95 r180 top
J3 "SFP+" TYCO_1888247-1 33,11.53 r0 top locked
J4 "MMCX" SAMTEC_MMCX-J-P-H-ST-TH1 192.761,56.567 r90 top
J5 "VITA 57" SAMTEC_ASP-134486-01 62.513,53.624 r90 top locked
J6 "P1" AMPHENOL_10052825-101LF 207.15,3.95 r90 top locked
J7 "P6" AMPHENOL_10052838-101LF 207.15,82.95 r90 top locked
J8 "" 3M_N2530-6002RB 158.828,32.507 r270 top locked
J9 "" 3M_N2530-6002RB 140.058,32.506 r270 top locked
J10 "Mini-Fit Jr.™" MOLEX_39-30-0040 199.715,67.809 r270 top locked
J11 "Jack" SWITCHCRAFT_712RA 199.788,67.844 r90 top locked
L1 "120R@100MHz" INDC1608X65N 102.498,88.95 r270 top
L2 "120R@100MHz" INDC1608X65N 89.998,88.7 r90 top
L3 "120R@100MHz" INDC1608X65N 100.248,40.7 r90 bottom
L4 "120R@100MHz" INDC1608X65N 98.423,40.35 r90 bottom
L5 "120R@100MHz" INDC1608X65N 101.998,39.7 r90 bottom
L6 "220R@100MHz" INDC2012X105N 28.75,10.5 r180 bottom
L7 "220R@100MHz" INDC2012X105N 28.75,12.5 r180 bottom
L8 "744393240090" WE-XHMI_4030 99.45,15.375 r180 top
L9 "120R@100MHz" INDC1608X65N 105.248,1.45 r180 top
L10 "4.7uH" INDM6965X300N 113.1,1.45 r180 top
L11 "120R@100MHz" INDC1608X65N 105.248,-0.3 r180 top
L12 "120R@100MHz" INDC1608X65N 105.15,19.652 r0 top
L13 "4.7uH" INDM6965X300N 139.748,2.45 r270 top
L14 "120R@100MHz" INDC1608X65N 105.15,18.152 r0 top
L15 "120R@100MHz" INDC1608X65N 105.15,16.652 r0 top
L16 "120R@100MHz" INDC1608X65N 108.2,11.975 r270 top
L18 "120R@100MHz" INDC1608X65N 103.1,15.85 r270 top
L19 "6.8uH" IND_COILCRAFT_XAL4030 132.998,3.95 r270 top
L20 "120R@100MHz" INDC1608X65N 130.748,0.7 r180 top
L21 "3.3uH" INDM5552X200N 132.75,12.694 r90 top
L22 "120R@100MHz" INDC1608X65N 133.998,17.2 r0 top
L23 "120R@100MHz" INDC1608X65N 134.998,8.2 r0 top
L24 "4.7uH" INDM6965X300N 70.748,2.2 r180 top
L25 "4.7uH" INDM6965X300N 70.748,15.2 r180 top
L26 "33uH" IND_WURTH_WE-TPC_4828 90.748,4.95 r270 top
L27 "10uH" IND_TDK_VLCF5020-1 90.748,11.45 r90 top
L28 "120R@100MHz" INDC1608X65N 91.748,16.45 r90 top
L29 "120R@100MHz" INDC1608X65N 135.025,84.1 r0 top
LD1 "Green" LED_KINGBRIGHT_KPH-1608CGCK 27.5,0 r180 top
LD2 "Green" LED_AVAGO_HSME-C120 -5.1,21.95 r270 bottom
LD3 "Green" LED_KINGBRIGHT_KPH-1608CGCK 42.25,9 r270 top
LD4 "Green" LED_KINGBRIGHT_KPH-1608CGCK 61,8.962 r270 top
LD5 "Green" LED_KINGBRIGHT_KPH-1608CGCK 56.312,8.962 r270 top
LD6 "Green" LED_KINGBRIGHT_KPH-1608CGCK 61,6.025 r90 top
LD7 "Green" LED_KINGBRIGHT_KPH-1608CGCK 42.25,6 r90 top
LD8 "Green" LED_KINGBRIGHT_KPH-1608CGCK 51.625,6.025 r90 top
LD9 "Green" LED_KINGBRIGHT_KPH-1608CGCK 46.937,6.025 r90 top
LD10 "Green" LED_KINGBRIGHT_KPH-1608CGCK 56.312,6.025 r90 top
LD11 "Red/Green" LED_DIALIGHT_571-0112F 0.41,21 r0 top
LD12 "Green" LED_KINGBRIGHT_KPH-1608CGCK 51.625,8.962 r270 top
LD13 "Green" LED_AVAGO_HSME-C120 -5.1,15.25 r270 bottom
LD14 "Green" LED_KINGBRIGHT_KPH-1608CGCK 46.937,9 r270 top
LD15 "Red" LED_AVAGO_HSMC-C120 -5.1,7.2 r270 bottom
LD18 "Green" LED_AVAGO_HSME-C120 -5.1,18.6 r270 bottom
M1 "Plated Hole" MTG300_600 153.498,88.45 r0 top locked
M2 "Plated Hole" MTG300_600 153.498,0.45 r0 top locked
M3 "Plated Hole" MTG300_600 0.568,88.9 r0 top locked
M4 "Plated Hole" MTG300_600 0.568,0 r0 top locked
M5 "PTH_3.4X6_BTKO" PTH-M3.4x6.0_BTKO 97.6,88.9 r180 top locked
M6 "PTH_3.4X6_BTKO" PTH-M3.4x6.0_BTKO 187.6,88.9 r180 top locked
M7 "PTH_3.4X6_BTKO" PTH-M3.4x6.0_BTKO 97.6,0 r0 top locked
M8 "PTH_3.4X6_BTKO" PTH-M3.4x6.0_BTKO 187.6,0 r0 top locked
OSC1 "125MHz" OSC_CRYSTEK_CCLD-033 116.648,88.2 r270 top
Plate1 "Cover SFP" AMPHENOL_U77A11108000P -9.675,10.975 r0 top
R1 "0" RESC1005X40N 176.461,58.762 r180 top
R2 "0" RESC0603X28N 92.248,79.2 r90 top
R3 "0" RESC1005X40N 162.68,18.872 r180 bottom
R4 "0" RESC0603X28N 93.248,79.2 r90 top
R5 "200" RESC1005X40N 87.248,77.95 r270 top
R6 "0" RESC0603X28N 92.248,79.95 r270 top
R7 "200" RESC1005X40N 85.998,77.95 r270 top
R8 "0" RESC0603X28N 93.248,79.95 r270 top
R9 "200" RESC1005X40N 84.998,77.95 r270 top
R10 "0" RESC0603X28N 89.484,82.652 r270 top
R11 "200" RESC1005X40N 83.748,77.95 r270 top
R12 "49R9" RESC1005X40N 90.998,82.2 r180 top
R13 "0" RESC1005X40N 179.724,56.367 r90 top
R14 "0" RESC1005X40N 176.461,56.222 r180 top
R15 "200" RESC1005X40N 80.925,80.73 r270 top
R16 "200" RESC1005X40N 80.9,82.55 r90 top
R17 "10k" RESC1005X40N 54.15,41.75 r90 bottom
R18 "10k" RESC1005X40N 51.475,59.475 r0 bottom
R19 "10k" RESC1005X40N 96.65,21.855 r90 top
R20 "0" RESC1005X40N 110.498,84.2 r180 top
R21 "0" RESC1005X40N 110.498,85.45 r180 top
R22 "10k" RESC1005X40N 118.473,83.45 r0 top
R23 "1k" RESC1005X40N 118.248,79.7 r0 top
R24 "100" RESC0603X28N 108.498,63.95 r0 bottom
R25 "100" RESC0603X28N 105.973,63.775 r90 bottom
R26 "100" RESC0603X28N 96.998,62.45 r270 bottom
R27 "10k" RESC1005X40N 128.718,82.95 r0 top
R28 "10k" RESC1005X40N 102.248,29.2 r0 top
R29 "10k" RESC1005X40N 101.748,30.2 r0 top
R30 "10k" RESC1005X40N 97.023,28.95 r90 top
R31 "10k" RESC1005X40N 96.023,28.45 r90 top
R32 "10k" RESC1005X40N 97.248,25.45 r270 top
R33 "10k" RESC1005X40N 96.248,24.95 r270 top
R34 "10k" RESC1005X40N 123.748,88.42 r90 top
R35 "1k" RESC1005X40N 115.998,48.45 r0 top
R36 "1k" RESC1005X40N 115.998,48.475 r180 bottom
R37 "10k" RESC1005X40N 81.6,25.775 r180 top
R38 "0" RESC1005X40N 186.4,7.65 r0 top
R39 "0" RESC1005X40N 186.4,10.75 r0 top
R40 "0" RESC1005X40N 186.4,11.85 r0 top
R41 "0" RESC1005X40N 186.4,6.75 r0 top
R42 "49R9" RESC1005X40N 122.198,58.95 r0 bottom
R43 "49R9" RESC1005X40N 128.248,59.2 r0 top
R44 "240" RESC1005X40N -1.25,22.275 r0 bottom
R45 "2k2" RESC1005X40N 19.025,27.175 r90 bottom
R46 "49R9" RESC1005X40N 126.523,55.425 r0 bottom
R47 "49R9" RESC1005X40N 120.298,64.8 r90 bottom
R48 "49R9" RESC1005X40N 123.248,64.7 r180 top
R49 "49R9" RESC1005X40N 122.198,59.85 r0 bottom
R50 "49R9" RESC1005X40N 122.198,63.45 r0 bottom
R51 "49R9" RESC1005X40N 122.198,58.05 r0 bottom
R52 "49R9" RESC1005X40N 123.648,63.05 r90 bottom
R53 "49R9" RESC1005X40N 122.198,64.35 r0 bottom
R54 "49R9" RESC1005X40N 126.498,61.75 r0 bottom
R55 "49R9" RESC1005X40N 122.198,62.55 r0 bottom
R56 "49R9" RESC1005X40N 128.198,60.9 r0 top
R57 "49R9" RESC1005X40N 122.198,60.75 r0 bottom
R58 "49R9" RESC1005X40N 126.498,59.05 r0 bottom
R59 "49R9" RESC1005X40N 127.048,60.85 r0 bottom
R60 "49R9" RESC1005X40N 122.198,61.65 r0 bottom
R61 "49R9" RESC1005X40N 126.498,58.15 r0 bottom
R62 "49R9" RESC1005X40N 126.498,59.95 r0 bottom
R63 "49R9" RESC1005X40N 122.198,56.25 r180 bottom
R64 "49R9" RESC1005X40N 122.198,57.15 r180 bottom
R65 "49R9" RESC1005X40N 122.198,55.275 r180 bottom
R66 "5k1" RESC1005X40N 125.248,64.7 r180 top
R67 "240" RESC1005X40N 128.248,58.2 r180 top
R68 "240" RESC1005X40N 117.498,58.575 r0 bottom
R69 "49R9" RESC1005X40N 128.248,57.2 r180 top
R70 "10k" RESC1005X40N 117.748,73.45 r90 bottom
R71 "10k" RESC1005X40N 121.248,68.95 r180 bottom
R72 "10k" RESC1005X40N 120.795,70.398 r270 bottom
R73 "10k" RESC1005X40N 126.05,73.644 r0 bottom
R74 "10k" RESC1005X40N 128.8,69.394 r0 bottom
R75 "10k" RESC1005X40N 128.8,70.369 r180 bottom
R76 "1k" RESC1005X40N 27.25,-1.25 r0 bottom
R77 "0" RESC1005X40N 162.68,17.526 r180 bottom
R78 "300" RESC1005X40N 30.7,2.475 r0 bottom
R79 "1k" RESC1005X40N 98.704,74.016 r0 top
R80 "1k" RESC1005X40N 100.609,74.701 r0 top
R81 "1k" RESC1005X40N 123.248,28.45 r90 bottom
R82 "1k" RESC1005X40N 124.248,30.95 r180 bottom
R83 "0" RESC0603X28N 98.498,51.95 r0 bottom
R84 "0" RESC0603X28N 97.973,52.95 r180 bottom
R85 "10k" RESC1005X40N 150.923,64.5 r90 top
R86 "10k" RESC1005X40N 149.498,64.95 r0 top
R87 "10k" RESC1005X40N 143.573,64.4 r180 top
R88 "22" RESC1005X40N 116.498,24.45 r180 top
R89 "22" RESC1005X40N 116.498,25.45 r180 top
R90 "22" RESC1005X40N 116.498,26.45 r180 top
R91 "22" RESC1005X40N 116.498,27.45 r180 top
R92 "10k" RESC1005X40N 139.498,64.2 r90 top
R93 "0" RESC1005X40N 141.998,65.45 r180 top
R94 "10k" RESC1005X40N 140.498,64.2 r270 top
R95 "1k" RESC1005X40N 147.498,59.45 r0 top
R96 "0" RESC1005X40N 118.248,24.45 r0 bottom
R97 "10k" RESC1005X40N 124.498,24.45 r0 bottom
R98 "2k2" RESC1005X40N 125.925,35.775 r270 top
R99 "2k2" RESC1005X40N 114.998,46.95 r90 top
R100 "2k2" RESC1005X40N 114.698,39.45 r90 top
R101 "200k" RESC1005X40N 154.773,19.45 r270 bottom
R102 "10k" RESC1005X40N 147.248,22.95 r90 bottom
R103 "10k" RESC1005X40N 148.248,22.45 r90 bottom
R104 "0" RESC1005X40N 116.525,36.7 r180 bottom
R105 "0" RESC1005X40N 115.325,34.425 r0 bottom
R106 "0" RESC1005X40N 116.552,37.675 r180 bottom
R107 "0" RESC1005X40N 126.45,34.15 r180 bottom
R108 "10k" RESC1005X40N 122.748,30.45 r90 bottom
R109 "0" RESC1005X40N 121.748,30.45 r90 bottom
R110 "0" RESC1005X40N 116.55,38.625 r180 bottom
R111 "0" RESC1005X40N 116.55,39.575 r0 bottom
R112 "0" RESC1005X40N 116.475,35.725 r180 bottom
R113 "10k" RESC1005X40N 116.7,32.45 r180 bottom
R114 "0" RESC1005X40N 122.248,32.95 r180 bottom
R115 "10k" RESC1005X40N 122.248,31.95 r180 bottom
R116 "10k" RESC1005X40N 129.025,34 r180 bottom
R117 "1k" RESC1005X40N 54.275,64.8 r0 bottom
R118 "10k" RESC1005X40N 51.45,60.45 r180 bottom
R119 "10M" RESC2113X55N 64.748,-1.55 r180 bottom
R120 "10M" RESC2113X55N 35.998,-1.8 r180 top
R121 "10k" RESC1005X40N 59.248,80.705 r90 bottom
R122 "10k" RESC1005X40N 61.998,80.705 r90 bottom
R123 "10k" RESC1005X40N 62.998,80.705 r90 bottom
R124 "100k" RESC1005X40N 68.248,83.2 r270 bottom
R125 "10k" RESC1608X55N 180.531,3.245 r180 top
R126 "1M1" RESC2012X60N 5.375,88.25 r0 top
R127 "0" RESC0603X28N 153.798,64.825 r0 bottom
R128 "0" RESC0603X28N 153.798,64.075 r0 bottom
R129 "200" RESC1005X40N 157.2,4.65 r0 top
R130 "22" RESC1005X40N 188.25,7.625 r0 top
R131 "22" RESC1005X40N 188.275,10.75 r0 top
R132 "22" RESC1005X40N 153.498,72.2 r0 bottom
R133 "22" RESC1005X40N 189.625,3.8 r0 top
R134 "22" RESC1005X40N 153.498,71.2 r0 bottom
R135 "22" RESC1005X40N 153.498,69.2 r0 bottom
R136 "22" RESC1005X40N 190.112,11.03 r0 top
R137 "22" RESC1005X40N 153.498,68.2 r0 bottom
R138 "22" RESC1005X40N 190.05,7.05 r0 top
R139 "22" RESC1005X40N 153.498,70.2 r0 bottom
R140 "22" RESC1005X40N 190.145,13.134 r0 top
R141 "0" RESC0603X28N 156.998,54.7 r0 bottom
R142 "0" RESC0603X28N 156.998,55.45 r0 bottom
R143 "0" RESC1005X40N 144.5,24.05 r180 bottom
R144 "0" RESC1005X40N 144.5,23.1 r180 bottom
R145 "0" RESC1005X40N 162.68,49.95 r180 bottom
R146 "0" RESC1005X40N 162.68,47.95 r180 bottom
R147 "0" RESC1005X40N 162.68,42.2 r180 bottom
R148 "0" RESC1005X40N 162.68,40.2 r180 bottom
R149 "0" RESC1005X40N 162.68,34.45 r180 bottom
R150 "0" RESC1005X40N 162.68,32.45 r180 bottom
R151 "0" RESC1005X40N 162.68,27.2 r180 bottom
R152 "0" RESC1005X40N 162.68,25.2 r180 bottom
R153 "0" RESC1005X40N 144.498,48.7 r180 bottom
R154 "0" RESC1005X40N 144.498,46.7 r180 bottom
R155 "0" RESC1005X40N 144.498,41.95 r180 bottom
R156 "0" RESC1005X40N 144.498,39.2 r180 bottom
R157 "0" RESC1005X40N 144.498,34.45 r180 bottom
R158 "0" RESC1005X40N 144.498,31.7 r180 bottom
R159 "0" RESC1005X40N 144.498,26.95 r180 bottom
R160 "1k" RESC1005X40N 50.5,9.5 r90 bottom
R161 "0" RESC1005X40N 162.68,48.95 r180 bottom
R162 "0" RESC1005X40N 162.68,46.95 r180 bottom
R163 "0" RESC1005X40N 162.68,41.2 r180 bottom
R164 "0" RESC1005X40N 162.68,39.2 r180 bottom
R165 "10k" RESC1005X40N 45.75,10.25 r90 bottom
R166 "10k" RESC1005X40N 2.9,16.2 r270 bottom
R167 "0" RESC1005X40N 162.68,33.45 r180 bottom
R168 "0" RESC1005X40N 162.68,31.45 r180 bottom
R169 "0" RESC1005X40N 162.68,26.2 r180 bottom
R170 "0" RESC1005X40N 162.68,24.2 r180 bottom
R171 "0" RESC1005X40N 144.498,47.7 r180 bottom
R172 "0" RESC1005X40N 144.498,45.7 r180 bottom
R173 "0" RESC1005X40N 144.498,40.95 r180 bottom
R174 "0" RESC1005X40N 144.498,38.2 r180 bottom
R175 "0" RESC1005X40N 144.498,33.45 r180 bottom
R176 "0" RESC1005X40N 144.498,30.7 r180 bottom
R177 "0" RESC1005X40N 144.498,25.95 r180 bottom
R178 "240" RESC1005X40N -1.227,4.8 r0 bottom
R179 "10k" RESC1005X40N 21.975,27.6 r90 top
R180 "10k" RESC1005X40N 21.175,23.55 r90 top
R181 "1k" RESC1005X40N 154.248,49.2 r90 bottom
R182 "1k" RESC1005X40N 154.248,42.7 r90 bottom
R183 "1k" RESC1005X40N 154.248,36.2 r90 bottom
R184 "7k5" RESC1005X40N 119.998,-1.8 r180 top
R185 "2k4" RESC1005X40N 122.998,-0.3 r180 top
R186 "1k6" RESC1005X40N 11.03,20.75 r0 bottom
R187 "10k" RESC1005X40N 103.498,6.95 r0 bottom
R188 "0" RESC1005X40N 103.248,5.45 r90 bottom
R189 "5k1" RESC1005X40N 120.998,0.7 r0 top
R190 "910" RESC1005X40N 121.498,2.2 r90 top
R191 "10k" RESC1005X40N 119.498,1.45 r90 top
R192 "22k" RESC1005X40N 109.073,5.95 r180 top
R193 "10k" RESC1005X40N 105.725,11.425 r0 top
R194 "0" RESC1005X40N 111.248,4.45 r180 bottom
R195 "10k" RESC1005X40N 103.875,11.425 r0 top
R196 "10k" RESC1005X40N 103.875,7.6 r180 top
R197 "10k" RESC1608X55N 174.775,2.325 r90 bottom
R198 "30k" RESC1005X40N 103.875,10.45 r180 top
R199 "10k" RESC1608X55N 183.5,5.25 r0 top
R200 "1k6" RESC1005X40N 126.998,13.7 r90 bottom
R201 "5k1" RESC1005X40N 126.498,0.7 r180 top
R202 "910" RESC1005X40N 125.998,2.2 r90 top
R203 "5k1" RESC1005X40N 126.498,-1.3 r0 top
R204 "2k" RESC1005X40N 125.998,13.7 r270 bottom
R205 "2k4" RESC1005X40N 124.998,-0.8 r90 top
R206 "7k5" RESC1005X40N 125.998,13.7 r270 top
R207 "1k" RESC1005X40N 43.85,8.775 r90 bottom
R208 "7k5" RESC1005X40N 129.248,8.45 r180 bottom
R209 "2k4" RESC1005X40N 125.498,15.2 r0 top
R210 "5k1" RESC1005X40N 129.248,7.45 r180 bottom
R211 "2k7" RESC1608X55N 125.498,17.425 r180 top
R212 "43k2" RESC1005X35N 122.748,2.2 r90 top
R213 "10k" RESC1005X40N 44.275,14.925 r0 bottom
R214 "5k1" RESC1005X40N 131.998,7.85 r90 top
R215 "10k" RESC1005X40N 78.498,0.45 r180 top
R216 "3k6" RESC1005X40N 132.998,7.45 r90 top
R217 "75k" RESC1005X40N 79.998,0.95 r90 top
R218 "9k1" RESC1005X40N 86.498,0.7 r0 top
R219 "5k1" RESC1005X40N 76.498,0.95 r270 top
R220 "3k6" RESC1005X40N 78.998,2.95 r90 top
R221 "10k" RESC1005X40N 77.998,2.95 r90 bottom
R222 "22k" RESC1005X40N 67.248,7.45 r90 top
R223 "22k" RESC1005X40N 67.248,9.95 r90 top
R224 "10k" RESC1005X40N 59.75,10.25 r90 bottom
R225 "1k" RESC1005X40N 55,9.5 r90 bottom
R226 "240" RESC1005X40N -1.45,19 r0 bottom
R227 "2k2" RESC1005X40N 18.998,21.7 r90 bottom
R228 "1k6" RESC1005X40N 84.498,2.45 r270 bottom
R229 "2k7" RESC1608X55N 83.248,2.45 r90 top
R230 "7k5" RESC1005X40N 82.498,0.45 r0 top
R231 "2k" RESC1005X40N 83.498,2.45 r90 bottom
R232 "2k4" RESC1005X40N 81.498,1.45 r0 top
R233 "240" RESC1005X40N 84.748,13.95 r90 bottom
R234 "3k" RESC1005X40N 83.748,13.95 r270 top
R235 "10k" RESC1005X40N 83.748,13.95 r270 bottom
R236 "10k" RESC1005X40N 50.25,6.25 r270 bottom
R237 "10k" RESC1005X40N 45.75,6.25 r270 bottom
R238 "10k" RESC1005X40N 55,6.25 r270 bottom
R239 "35k7" RESC1608X55N 82.748,16.2 r0 top
R240 "28k7" RESC1608X55N 81.748,13.7 r0 top
R241 "43k2" RESC1005X35N 80.248,2.95 r90 top
R242 "100k" RESC1005X40N 80.248,2.95 r90 bottom
R243 "300k" RESC1005X40N 78.998,2.95 r90 bottom
R244 "300k" RESC1005X40N 79.498,1.45 r180 bottom
R245 "0" RESC0603X28N 156.998,56.2 r0 bottom
R246 "0" RESC0603X28N 156.998,56.95 r0 bottom
R247 "49R9" RESC1005X40N 126.498,57.25 r0 bottom
R248 "49R9" RESC1005X40N 126.498,56.35 r0 bottom
R249 "10k" RESC1005X40N 59.75,6.25 r270 bottom
R250 "10k" RESC1005X40N 43.675,6.45 r270 bottom
R251 "10k" RESC1005X40N 95.248,71.95 r180 bottom
R252 "10k" RESC1005X40N 95.248,70.95 r0 bottom
R253 "10k" RESC1005X40N 94.498,76.95 r180 bottom
R254 "1k" RESC1005X40N 102.748,70.95 r0 bottom
R255 "2k2" RESC1005X40N 2.025,7.35 r90 bottom
R256 "10k" RESC1005X40N 121.173,89.675 r270 top
R257 "10k" RESC1608X55N 183.5,6.75 r0 top
R258 "9k1" RESC1005X40N 61.073,80.7 r90 bottom
R259 "7k5" RESC1005X40N 66.173,83.675 r270 bottom
R260 "10k" RESC1608X55N 173.25,0.65 r270 bottom
R261 "2k7" RESC1608X55N 183.025,8.5 r0 top
R262 "10k" RESC1608X55N 180.05,10.85 r0 bottom
R263 "0" RESC1005X40N 165.75,6 r180 top
R264 "0" RESC1005X40N 171.239,1.652 r180 bottom
R265 "2k7" RESC1608X55N 180,8.5 r180 top
R266 "0" RESC1005X40N 170.225,4.575 r90 top
R267 "10k" RESC1608X55N 180.25,14 r180 top
R268 "10k" RESC1608X55N 174.145,12.365 r180 top
R269 "100k" RESC1005X40N 177.423,17.046 r90 top
R270 "0" RESC1005X40N 186.4,13.125 r0 top
R271 "0" RESC1005X40N 106.223,28.8 r180 top
R272 "0" RESC1005X40N 116.498,28.7 r180 bottom
R273 "1k" RESC1005X40N 117,32.625 r90 top
R274 "22" RESC1005X40N 166.175,0.7 r270 top
R275 "200" RESC1005X40N 166.195,2.541 r270 top
R276 "0" RESC1005X40N 186.275,3.85 r0 top
R277 "10k" RESC1608X55N 160.3,4.125 r180 top
R278 "10k" RESC1005X40N 22.125,24.475 r270 top
R279 "10k" RESC1608X55N 181.936,0.955 r90 top
R280 "10k" RESC1608X55N 180.398,0.955 r90 top
R281 "10k" RESC1608X55N 178.886,0.955 r90 top
R282 "10k" RESC1608X55N 179.3,9.35 r0 bottom
R283 "0" RESC1005X40N 157.875,6.5 r90 top
R284 "10k" RESC1005X40N 51.95,54.15 r90 bottom
R285 "10k" RESC1005X40N 19.525,24.775 r90 top
R286 "10k" RESC1005X40N 20.75,26.325 r270 top
R287 "240" RESC1005X40N -1.8,16.375 r180 bottom
R288 "10k" RESC1005X40N 23.425,30.8 r90 top
R289 "330k" RESC1005X40N 103.875,8.55 r180 top
R290 "5k1" RESC1005X40N 103.875,9.5 r180 top
SW1 "Switch" SW_TYCO_1571983-1 92.939,74.854 r0 top
SW2 "Switch" SW_OMRON_B3U-3000PM -4.05,11.1 r90 bottom
T1 "DMP510DL-7" SOT90P240X115-3N 129.748,85.45 r90 top
T2 "IRFML8244TRPbF" SOT95P237X112-3N 125.498,88.7 r0 bottom
T3 "IRFML8244TRPbF" SOT95P237X112-3N 16.248,26.7 r180 bottom
T4 "IRFML8244TRPbF" SOT95P237X112-3N 119.498,31.45 r270 bottom
T5 "IRFML8244TRPbF" SOT95P237X112-3N 127.25,31.7 r180 bottom
T6 "IRFML8244TRPbF" SOT95P237X112-3N 125.748,28.2 r180 bottom
T7 "FDS9926A" SOIC127P600X175-8N 113.748,8.2 r0 top
T8 "IRFML8244TRPbF" SOT95P237X112-3N 43.45,12.525 r270 bottom
T9 "FDS9926A" SOIC127P600X175-8N 71.498,8.7 r0 top
T10 "IRFML8244TRPbF" SOT95P237X112-3N 61,2.25 r90 bottom
T11 "IRFML8244TRPbF" SOT95P237X112-3N 42.25,2.25 r90 bottom
T12 "IRFML8244TRPbF" SOT95P237X112-3N 51.5,2.25 r90 bottom
T13 "IRFML8244TRPbF" SOT95P237X112-3N 46.75,2.25 r90 bottom
T14 "IRFML8244TRPbF" SOT95P237X112-3N 56.25,2.25 r90 bottom
T15 "BSS138LT1G" SOT95P240X110-3N 171.706,4.076 r270 bottom
T16 "IRFML8244TRPbF" SOT95P237X112-3N 31.25,0 r270 bottom
T17 "IRFML8244TRPbF" SOT95P237X112-3N 94.765,74.485 r270 bottom
T18 "IRFML8244TRPbF" SOT95P237X112-3N 119.873,83.8 r0 bottom
T19 "IRFML8244TRPbF" SOT95P237X112-3N 16.248,21.7 r180 bottom
T20 "IRFML8244TRPbF" SOT95P237X112-3N 47,13 r270 bottom
T21 "IRFML8244TRPbF" SOT95P237X112-3N -0.45,6.975 r180 bottom
T22 "IRFML8244TRPbF" SOT95P237X112-3N 50.95,57.05 r90 bottom
T23 "IRFML8244TRPbF" SOT95P237X112-3N -0.925,14.025 r180 bottom
T24 "BSS138LT1G" SOT95P240X110-3N 180,11.25 r270 top
T25 "BSS138LT1G" SOT95P240X110-3N 179.891,16.574 r0 top
T26 "BSS138LT1G" SOT95P240X110-3N 163.775,3.025 r0 top
TP1 "Power Good" TPS127#1 42.25,12.75 r0 top
TP2 "P12V0" TPS127#1 145.275,-0.575 r0 top
TP3 "P3V3" TPS127#1 56.312,12.75 r0 top
TP4 "P2V5" TPS127#2 61,2.25 r0 top
TP5 "P1V0" TPS127#1 42.25,2.25 r0 top
TP6 "P1V5" TPS127#1 51.625,2.25 r90 top
TP7 "P1V2" TPS127#1 46.937,2.25 r90 top
TP8 "P1V8" TPS127#1 56.312,2.25 r90 top
TP9 "P3V3" TPS127#1 51.625,12.75 r0 top
TP10 "P1V8" TPS127#1 46.937,12.75 r90 top
TR1 "1:2" XFMR_MINI-CIRCUITS_AT1521 176.461,57.497 r90 top
W1 "Header 2" SAMTEC_MTLW-102-07-L-S-250 84.998,-1.55 r0 top
W2 "Header 2" SAMTEC_MTLW-102-07-L-S-250 79.248,-1.55 r180 top
W3 "Header 4" SAMTEC_HTSW-104-23-L-S 20.755,-1.425 r180 top

## Footprints (in the part's own frame and the unit in brackets; to place one, negate y for a bottom-side part, rotate by r counter-clockwise, add the part's x,y. Pads: shape width x height; smd on the part's side, far side on the other; paste and mask are expansions set on the pad)
3M_N2530-6002RB [mm] "30 Contacts - Straight .100\" x .100\" Low Profile Four-Wall Header"
  round 1.6 hole 1: 1(-17.78,-1.27) 2(-17.78,1.27) 3(-15.24,-1.27) 4(-15.24,1.27) 5(-12.7,-1.27) 6(-12.7,1.27) 7(-10.16,-1.27) 8(-10.16,1.27) 9(-7.62,-1.27) 10(-7.62,1.27) 11(-5.08,-1.27) 12(-5.08,1.27) 13(-2.54,-1.27) 14(-2.54,1.27) 15(0,-1.27) 16(0,1.27) 17(2.54,-1.27) 18(2.54,1.27) 19(5.08,-1.27) 20(5.08,1.27) 21(7.62,-1.27) 22(7.62,1.27) 23(10.16,-1.27) 24(10.16,1.27) 25(12.7,-1.27) 26(12.7,1.27) 27(15.24,-1.27) 28(15.24,1.27) 29(17.78,-1.27) 30(17.78,1.27)
  silkscreen extent -22.71,-4.85 22.71,4.52, body extent -22.71,-4.11 22.71,4.52, height 9.91
AMPHENOL_10052825-101LF [mm] "72 Contacts, 2mm Pitch, 6 Columns, 4 Pairs per Column, 4 Walls, Right Angle Header"
  round 1.1 hole 0.5: A1(-5,-7.65) A2(-3,-7.75) A3(-1,-7.65) A4(1,-7.75) A5(3,-7.65) A6(5,-7.75) B1(-5,-6.25) B2(-3,-6.35) B3(-1,-6.25) B4(1,-6.35) B5(3,-6.25) B6(5,-6.35) C1(-5,-4.85) C2(-3,-4.95) C3(-1,-4.85) C4(1,-4.95) C5(3,-4.85) C6(5,-4.95) D1(-5,-3.45) D2(-3,-3.55) D3(-1,-3.45) D4(1,-3.55) D5(3,-3.45) D6(5,-3.55) E1(-5,-2.05) E2(-3,-2.15) E3(-1,-2.05) E4(1,-2.15) E5(3,-2.05) E6(5,-2.15) F1(-5,-0.65) F2(-3,-0.75) F3(-1,-0.65) F4(1,-0.75) F5(3,-0.65) F6(5,-0.75) G1(-5,0.75) G2(-3,0.65) G3(-1,0.75) G4(1,0.65) G5(3,0.75) G6(5,0.65) H1(-5,2.15) H2(-3,2.05) H3(-1,2.15) H4(1,2.05) H5(3,2.15) H6(5,2.05) I1(-5,3.55) I2(-3,3.45) I3(-1,3.55) I4(1,3.45) I5(3,3.55) I6(5,3.45) J1(-5,4.95) J2(-3,4.85) J3(-1,4.95) J4(1,4.85) J5(3,4.95) J6(5,4.85) K1(-5,6.35) K2(-3,6.25) K3(-1,6.35) K4(1,6.25) K5(3,6.35) K6(5,6.25) L1(-5,7.75) L2(-3,7.65) L3(-1,7.75) L4(1,7.65) L5(3,7.75) L6(5,7.65)
  silkscreen extent -6.95,-21.95 6.95,11.85, body extent -6.95,-21.95 6.95,11.85, height 15.25
AMPHENOL_10052838-101LF [mm] "96 Contacts, 2mm Pitch, 8 Columns, 4 Pairs per Column, 4 Walls, Right Angle Header"
  round 1.1 hole 0.5: A1(-7,-7.65) A2(-5,-7.75) A3(-3,-7.65) A4(-1,-7.75) A5(1,-7.65) A6(3,-7.75) A7(5,-7.65) A8(7,-7.75) B1(-7,-6.25) B2(-5,-6.35) B3(-3,-6.25) B4(-1,-6.35) B5(1,-6.25) B6(3,-6.35) B7(5,-6.25) B8(7,-6.35) C1(-7,-4.85) C2(-5,-4.95) C3(-3,-4.85) C4(-1,-4.95) C5(1,-4.85) C6(3,-4.95) C7(5,-4.85) C8(7,-4.95) D1(-7,-3.45) D2(-5,-3.55) D3(-3,-3.45) D4(-1,-3.55) D5(1,-3.45) D6(3,-3.55) D7(5,-3.45) D8(7,-3.55) E1(-7,-2.05) E2(-5,-2.15) E3(-3,-2.05) E4(-1,-2.15) E5(1,-2.05) E6(3,-2.15) E7(5,-2.05) E8(7,-2.15) F1(-7,-0.65) F2(-5,-0.75) F3(-3,-0.65) F4(-1,-0.75) F5(1,-0.65) F6(3,-0.75) F7(5,-0.65) F8(7,-0.75) G1(-7,0.75) G2(-5,0.65) G3(-3,0.75) G4(-1,0.65) G5(1,0.75) G6(3,0.65) G7(5,0.75) G8(7,0.65) H1(-7,2.15) H2(-5,2.05) H3(-3,2.15) H4(-1,2.05) H5(1,2.15) H6(3,2.05) H7(5,2.15) H8(7,2.05) I1(-7,3.55) I2(-5,3.45) I3(-3,3.55) I4(-1,3.45) I5(1,3.55) I6(3,3.45) I7(5,3.55) I8(7,3.45) J1(-7,4.95) J2(-5,4.85) J3(-3,4.95) J4(-1,4.85) J5(1,4.95) J6(3,4.85) J7(5,4.95) J8(7,4.85) K1(-7,6.35) K2(-5,6.25) K3(-3,6.35) K4(-1,6.25) K5(1,6.35) K6(3,6.25) K7(5,6.35) K8(7,6.25) L1(-7,7.75) L2(-5,7.65) L3(-3,7.75) L4(-1,7.65) L5(1,7.75) L6(3,7.65) L7(5,7.75) L8(7,7.65)
  silkscreen extent -8.95,-21.95 8.95,11.85, body extent -8.95,-21.95 8.95,11.85, height 15.25
AMPHENOL_U77A11108000P [mm] "Plastic Dust Cover SFP Cage"
  silkscreen extent 3.88,-6.09 4.9,7.14, body extent -4.03,-6.82 4.9,7.87, height 10.2